# Altium PCB PCB_Solenoid_Board-v1.0.PcbDoc
Units mm, origin at the board's own origin, x right, y up, seen from the top; angles counter-clockwise.
Board outline 65.99 x 57.84 mm, 2 copper layers (Top Layer, Bottom Layer), stack 1.57 mm thick; 61 components, 37 nets, 164 pads, 111 vias.
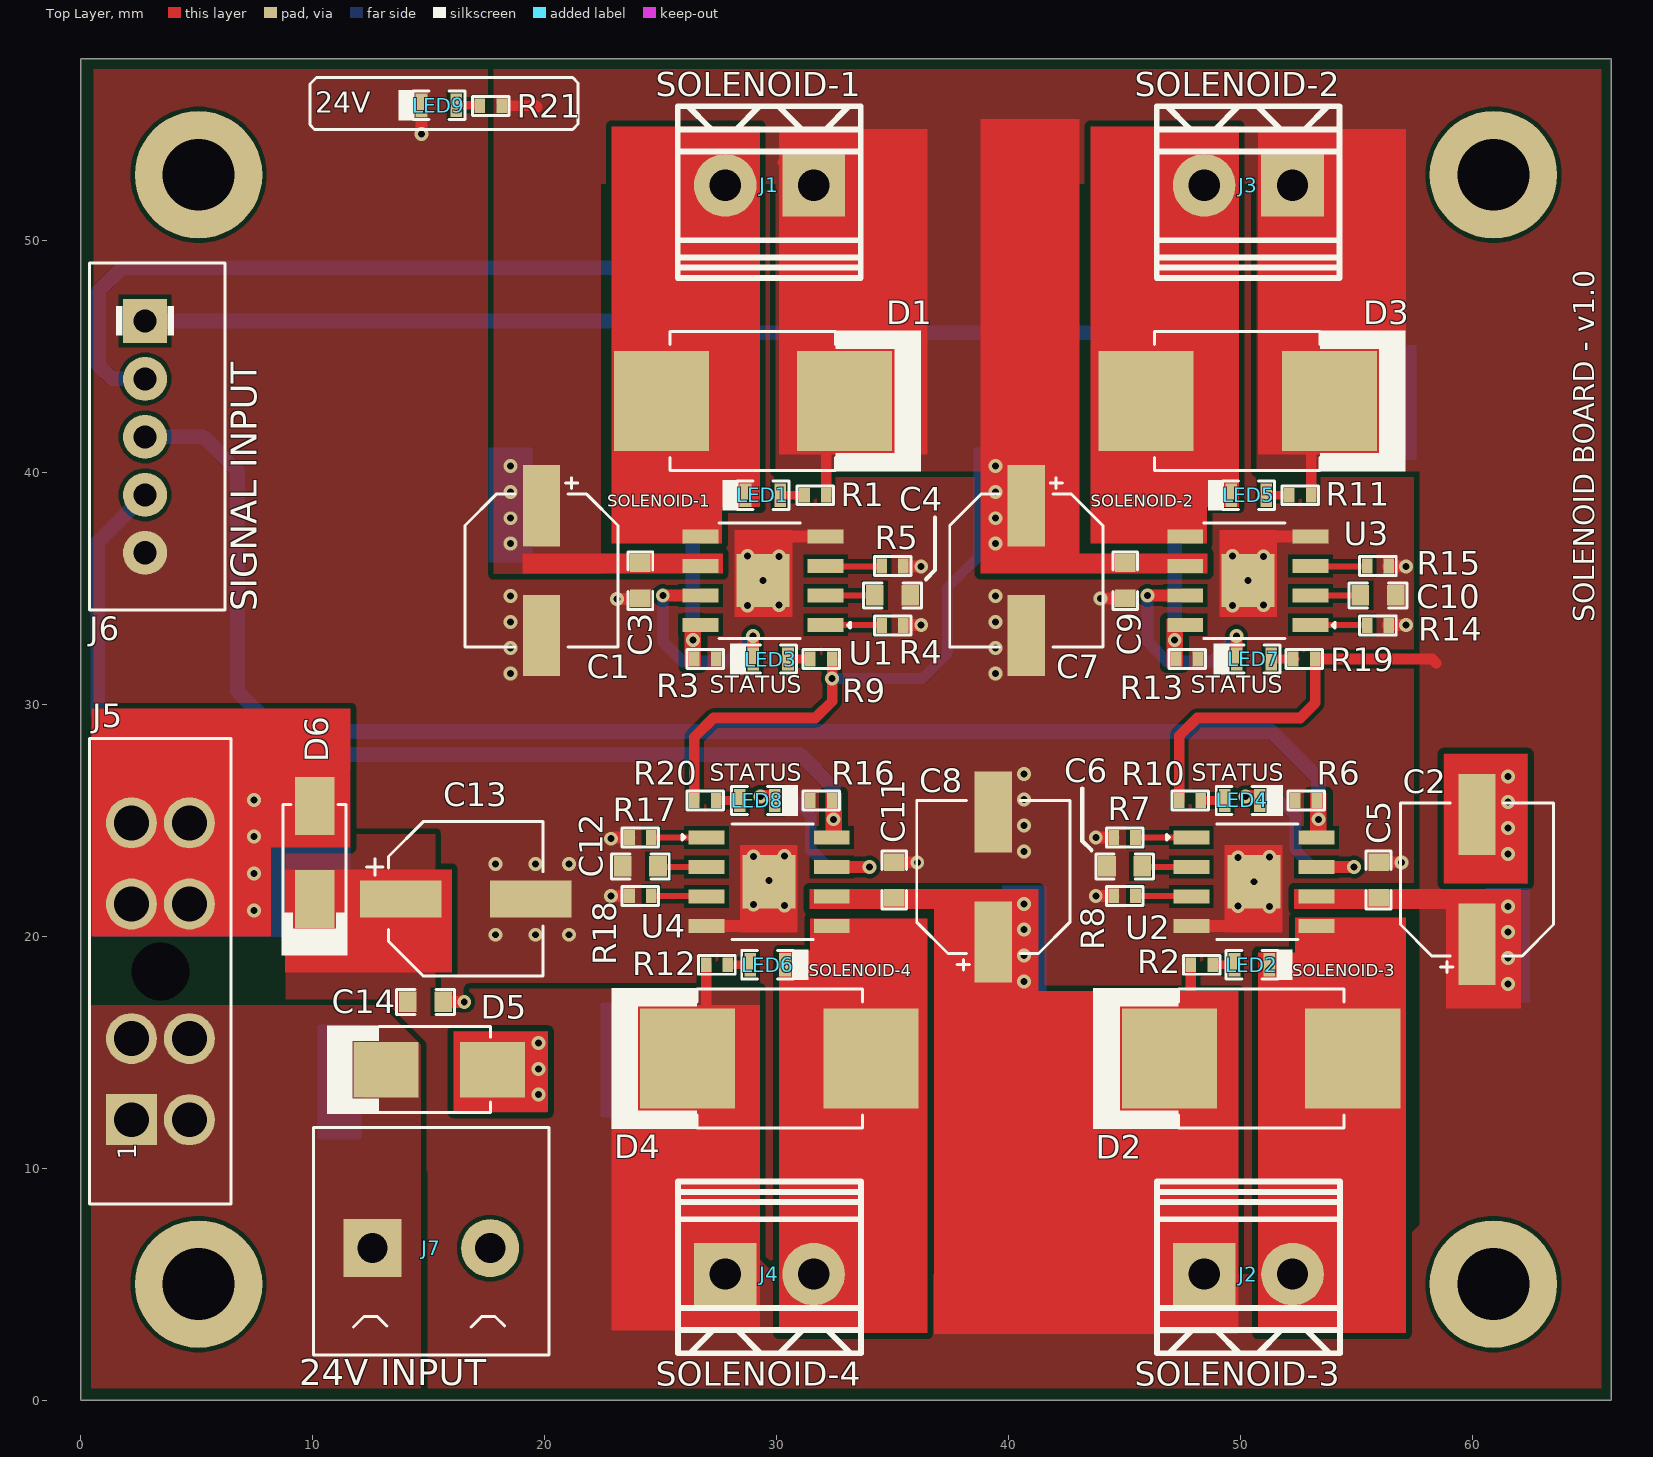
[diagram p0: Top Layer view]
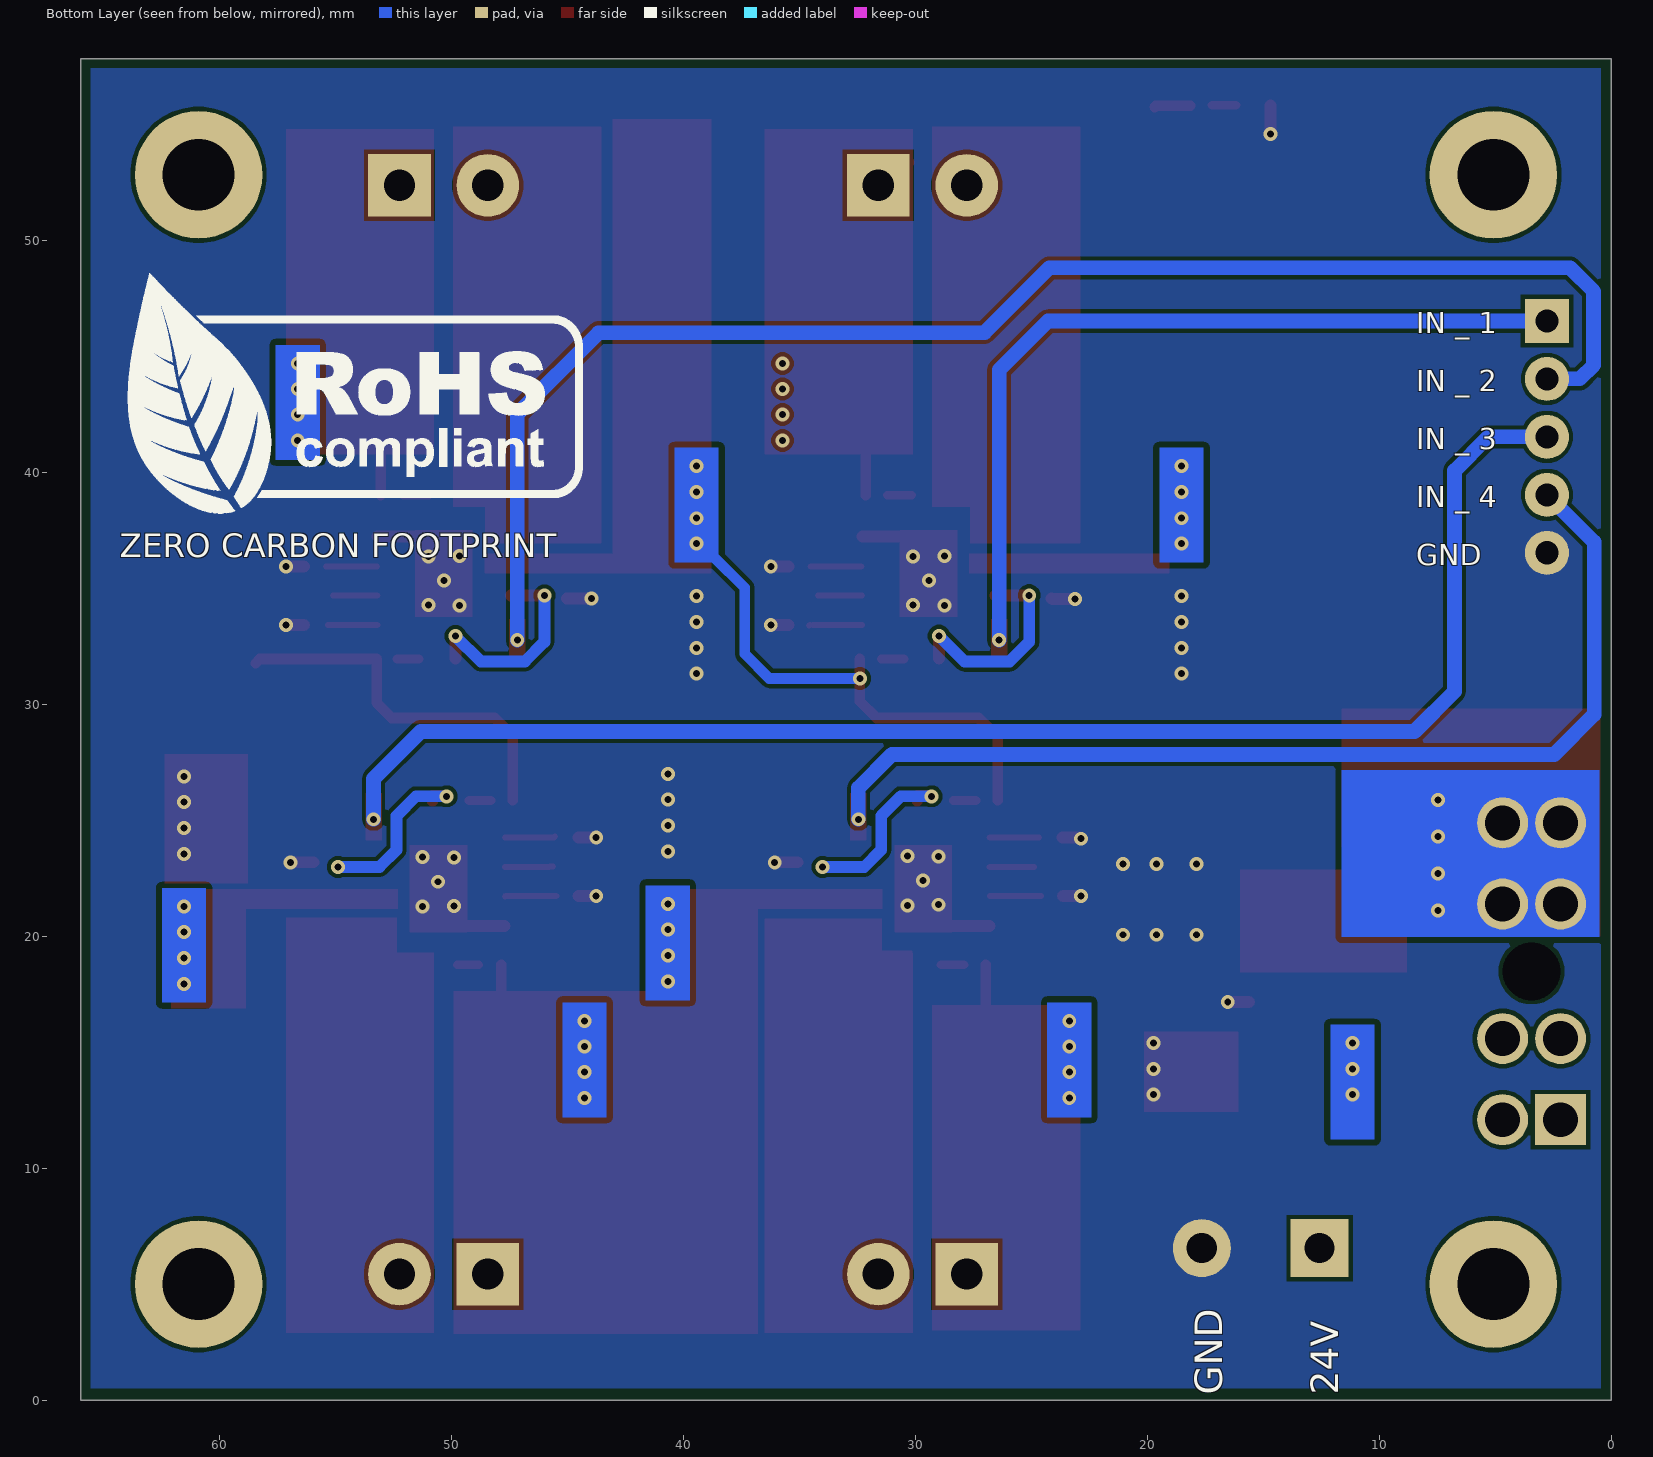
[diagram p1: Bottom Layer view, seen from below]
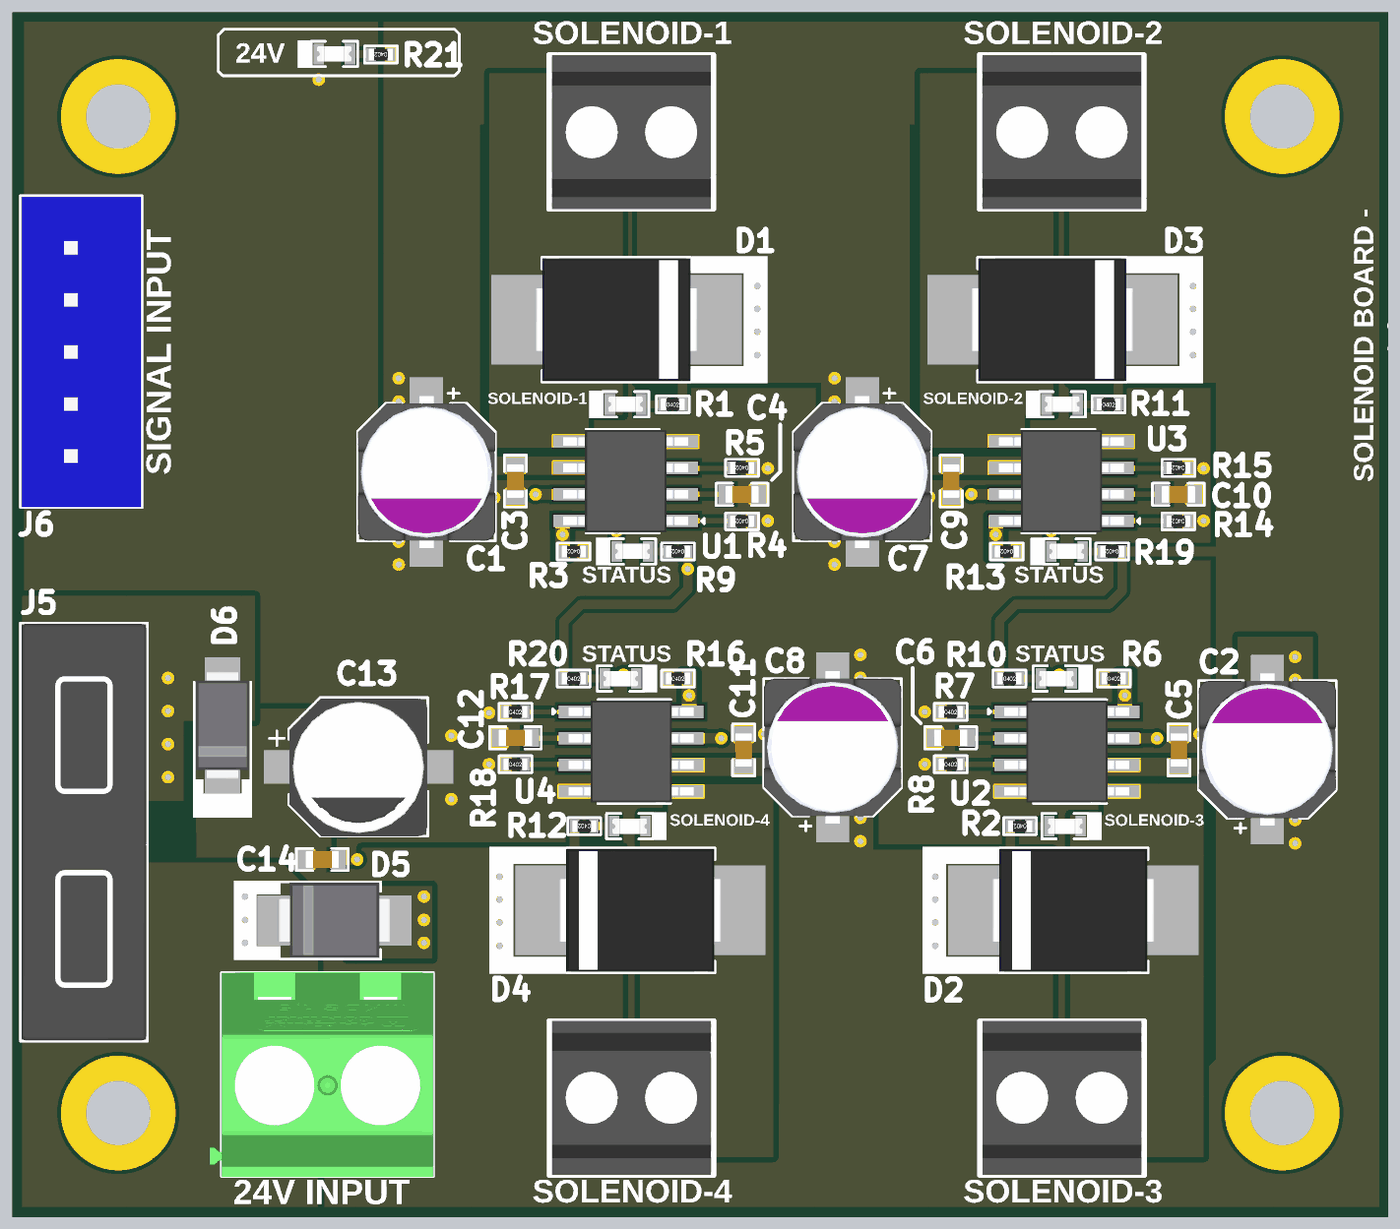
[diagram p2: 3D render of the assembled board from above, using the file's embedded part models]

## Layer stack, top to bottom
Top Solder: solder mask 0.01, Solder Resist, Dk 3.5
Top Layer: signal copper 0.035
Dielectric 1: core 1.5, FR-4, Dk 4.8
Bottom Layer: signal copper 0.035
Bottom Solder: solder mask 0.01, Solder Resist, Dk 3.5

## Board outline
0,0 0,57.836 65.989,57.836 65.989,0

## Design rules (kind name [scope] priority, off if disabled: settings)
Clearance [All] p1: gap=0.178 ignorepadtopadclearanceinfootprint=FALSE except(0.254: Fill-Poly Poly-Poly)
ComponentClearance [All] p1: gap=0.127 collisioncheckmode=3 verticalgap=0.127 showdistances=FALSE
HoleSize [All] p1: absolutevalues=TRUE maxlimit=25.4 minlimit=0.025 maxpercent=80.000 minpercent=20.000
HoleToHoleClearance [All] p1: gap=0.025 allowstackedmicrovias=TRUE
MinimumSolderMaskSliver [All] p1: minsoldermaskwidth=0
PolygonConnect [All] p1: connectstyle=Direct reliefconductorwidth=0.254 reliefentries=4 polygonreliefangle="90 Angle" airgapwidth=0.254
RoutingVias [All] p1: holewidth=0.3 width=0.6 viastyle="Through Hole" minholewidth=0.3 minwidth=0.6 maxholewidth=0.3 maxwidth=0.6
SilkToSilkClearance [All] p1: silktosilkclearance=0
SilkToSolderMaskClearance [IsPad] p1: minsilkscreentomaskgap=0 clearancetoexposedcopper=TRUE
SolderMaskExpansion SolderMaskExpansion_1 [IsVia] p1: expansion=0 istentingtop=FALSE soldermaskfromhole=TRUE
SolderMaskExpansion [Not IsVia] p2: expansion=0.102 istentingtop=FALSE
UnRoutedNet [All] p1: checkbadconnections=TRUE
Width [All] p1: maxlimit=2.54 minlimit=0.203 preferedwidth=0.305 minimp=50.000000 maximp=50.000000 favimp=50.000000
23 further rules are at their usual default settings.

## Components (designator, comment, footprint, x,y, rotation, side; value= is the part's Value field where it differs from the comment)
C1 "10uF" 50SVPF10M 19.863,35.763 r270 top locked
C2 "10uF" 50SVPF10M 60.198,22.454 r90 top locked
C3 "100nF" Cap-0603 24.13,35.331 r90 top locked
C4 "100nF" Cap-0603 35.001,34.696 r180 top locked
C5 "100nF" Cap-0603 55.956,22.428 r270 top locked
C6 "100nF" Cap-0603 45.009,23.012 r0 top locked
C7 "10uF" 50SVPF10M 40.767,35.763 r270 top locked
C8 "10uF" 50SVPF10M 39.345,22.555 r90 top locked
C9 "100nF" Cap-0603 45.034,35.331 r90 top locked
C10 "100nF" Cap-0603 55.931,34.696 r180 top locked
C11 "100nF" Cap-0603 35.077,22.428 r270 top locked
C12 "100nF" Cap-0603 24.13,23.012 r0 top locked
C13 "100uF" RVT1H101M0607 16.601,21.615 r0 top locked
C14 "100nF" Cap-0603 14.863,17.17 r180 top locked
D1 "MURS360T3G" SMC 28.981,43.078 r180 top locked
D2 "MURS360T3G" SMC 50.893,14.732 r0 top locked
D3 "MURS360T3G" SMC 49.884,43.078 r180 top locked
D4 "MURS360T3G" SMC 30.119,14.732 r0 top locked
D5 "SMBJ28A-13-F" SMB_ 15.452,14.249 r180 top locked value=330pF
D6 "SS56" SMA 10.084,23.615 r90 top locked
J1 "DB125-3.81-2P-BK-S" DB125-3.81-2P-BK-S 29.693,52.375 r180 top locked
J2 "DB125-3.81-2P-BK-S" DB125-3.81-2P-BK-S 50.343,5.436 r0 top locked
J3 "DB125-3.81-2P-BK-S" DB125-3.81-2P-BK-S 50.343,52.375 r180 top locked
J4 "DB125-3.81-2P-BK-S" DB125-3.81-2P-BK-S 29.693,5.436 r0 top locked
J5 "178.6165.0002" 178.6165.0002 3.434,18.49 r90 top locked
J6 "B5B-XH-A(LF)(SN)" B5B-XH-A(LF)(SN)_ 2.774,41.533 r270 top locked
J7 "1715721" 1715721 15.113,6.553 r0 top locked
LED1 "Emerald" LED-0603 29.413,39.014 r180 top locked
LED2 "Emerald" LED-0603 50.495,18.771 r0 top locked
LED3 "RED" LED-0603 29.743,31.953 r180 top locked
LED4 "RED" LED-0603 50.077,25.857 r0 top locked
LED5 "Emerald" LED-0603 50.355,39.014 r180 top locked
LED6 "Emerald" LED-0603 29.616,18.771 r0 top locked
LED7 "RED" LED-0603 50.584,31.953 r180 top locked
LED8 "RED" LED-0603 29.172,25.857 r0 top locked
LED9 "RED" LED-0603 15.443,55.829 r180 top locked
R1 "2.2K" Res-0402 31.674,39.014 r0 top locked
R2 "2.2K" Res-0402 48.336,18.771 r180 top locked
R3 "10K" Res-0402 26.924,31.953 r180 top locked
R4 "1M" Res-0402 35.001,33.401 r180 top locked value=1MR
R5 "1M" Res-0402 35.001,35.966 r180 top locked value=1MR
R6 "10K" Res-0402 52.832,25.857 r0 top locked
R7 "1M" Res-0402 45.009,24.257 r0 top locked value=1MR
R8 "1M" Res-0402 45.009,21.742 r0 top locked value=1MR
R9 "3.9K" Res-0402 31.928,31.953 r180 top locked value=3.9kR
R10 "3.9K" Res-0402 47.828,25.857 r0 top locked value=3.9kR
R11 "2.2K" Res-0402 52.578,39.014 r0 top locked
R12 "2.2K" Res-0402 27.432,18.771 r180 top locked
R13 "10K" Res-0402 47.701,31.953 r180 top locked
R14 "1M" Res-0402 55.931,33.401 r180 top locked value=1MR
R15 "1M" Res-0402 55.931,35.966 r180 top locked value=1MR
R16 "10K" Res-0402 31.928,25.857 r0 top locked
R17 "1M" Res-0402 24.13,24.257 r0 top locked value=1MR
R18 "1M" Res-0402 24.13,21.742 r0 top locked value=1MR
R19 "3.9K" Res-0402 52.756,31.953 r180 top locked value=3.9kR
R20 "3.9K" Res-0402 26.924,25.857 r0 top locked value=3.9kR
R21 "3.9K" Res-0402 17.678,55.804 r180 top locked value=3.9kR
U1 "DRV103H/2K5" "8-SO PowerPad" 29.419,35.331 r180 top locked
U2 "DRV103H/2K5" "8-SO PowerPad" 50.582,22.352 r0 top locked
U3 "DRV103H/2K5" "8-SO PowerPad" 50.321,35.331 r180 top locked
U4 "DRV103H/2K5" "8-SO PowerPad" 29.681,22.352 r0 top locked

## Footprints (in the part's own frame and the unit in brackets; to place one, negate y for a bottom-side part, rotate by r counter-clockwise, add the part's x,y. Pads: shape width x height; smd on the part's side, far side on the other; paste and mask are expansions set on the pad)
"8-SO PowerPad" [mm]
  rect 1.55x0.6 smd mask+0.07: 1(-2.7,1.905) 2(-2.7,0.635) 3(-2.7,-0.635) 4(-2.7,-1.905) 5(2.7,-1.905) 6(2.7,-0.635) 7(2.7,0.635) 8(2.7,1.905)
  rect 2.287x2.287 smd mask+0.07: 9(0,0)
  silkscreen extent -3.76,-2.49 1.9,2.49, body extent -3,-2.45 3,2.45, height 1.7
50SVPF10M [mm]
  rect 3.5x1.6 smd: 1(-2.8,0) 2(2.8,0)
  silkscreen extent -4.01,-3.3 3.3,3.3, body extent -3.65,-3.3 3.65,3.3, height 5.9
178.6165.0002 [mm]
  rect 2.2x2.2 hole 1.5 paste-2539.97 mask+0.051: 1(-6.4,1.25)
  round 2.2 hole 1.5 paste-2539.97 mask+0.051: 2(-2.9,1.25) 3(2.9,1.25) 4(6.4,1.25) 5(6.4,-1.25) 6(2.9,-1.25) 7(-2.9,-1.25) 8(-6.4,-1.25)
  round 0 hole 2.5 unplated paste-2539.97: ""(0,0)
  silkscreen extent -10.03,-3.05 10.03,3.05, body extent -10,-3 10,3, height 17.5
1715721 [mm]
  rect 2.5x2.5 / inner round 2.5 / far side rect 2.5x2.5 hole 1.3: 1(-2.54,0)
  round 2.5 hole 1.3: 2(2.54,0)
  silkscreen extent -5.08,-4.6 5.08,5.2, body extent -5.64,-4.62 5.09,5.21, height 14.2
B5B-XH-A(LF)(SN)_ [mm] "XH Header Male Pin 0.098\"(2.50mm) 5 Through Hole,P=2.5mm Wire To Board / Wire To Wire Connector RoHS"
  rect 1.9x1.9 hole 1: 1(-5,0)
  round 1.9 hole 1: 2(-2.5,0) 3(0,0) 4(2.5,0) 5(5,0)
  silkscreen extent -7.49,-2.39 7.47,3.45, body extent -7.45,-2.34 7.45,3.41, height 7
Cap-0603 [mil]
  rect 30x35 smd mask+2.36: 1(-30,0) 2(30,0)
  silkscreen extent -49,-21 49,21, body extent -32,-16 31,16, height 34
DB125-3.81-2P-BK-S [mm]
  rect 2.7x2.7 hole 1.35 paste-2539.97 mask+0.051: 1(-1.905,0)
  round 2.7 hole 1.35 paste-2539.97 mask+0.051: 2(1.905,0)
  silkscreen extent -3.94,-3.41 3.95,3.99, body extent -3.81,-3.4 3.81,4, height 8.2
LED-0603 [mm]
  rect 0.5x1 smd: 1(-0.75,0) 2(0.75,0)
  silkscreen extent -1.12,-0.66 1.75,0.66, body extent -0.82,-0.37 0.82,0.36, height 0.68
Res-0402 [mil]
  rect 18x25 smd mask+2.17: 1(-18.5,0) 2(18.5,0)
  silkscreen extent -32,-17 32,16, body extent -23,-11 23,11, height 16
RVT1H101M0607 [mm]
  rect 3.5x1.6 smd: 1(-2.8,0) 2(2.8,0)
  silkscreen extent -4.27,-3.33 3.32,3.33, body extent -3.31,-3.33 3.29,3.27, height 7.94
SMA [mm]
  rect 2.5x1.7 smd: 1(-2,0) 2(2,0)
  silkscreen extent -4.44,-1.42 2.06,1.42, body extent -2.6,-1.3 2.6,1.3, height 2.4
SMB_ [mm]
  rect 2.8x2.4 smd: 1(-2.3,0) 2(2.3,0)
  silkscreen extent -2.21,-1.9 4.83,1.91, body extent -2.7,-1.8 2.7,1.8, height 2.3
SMC [mm]
  rect 4.1x4.3 smd: 1(-3.95,0) 2(3.95,0)
  silkscreen extent -7.24,-3.05 3.58,3.05, body extent -3.9,-2.95 3.9,2.95, height 2.41

## Part data
C1 C2 C7 C8: library part 50SVPF10M, "CAP ALUM POLY 10UF 20% 50V SMD", LCSC Part Number=C2162323, Manufacturer=Panasonic, Supplier Part Number=667-50SVPF10M, Category="Polymer Capacitors", ComponentLink1Description=https://datasheet.ciiva.com/48542/svpf-eng-ds-48542427.pdf?src-supplier=Distrelec, ComponentLink1URL=https://datasheet.ciiva.com/48542/svpf-eng-ds-48542427.pdf?src-supplier=Distrelec, ComponentLink2Description=https://datasheet.ciiva.com/24216/svpf-os-262415-24216043.pdf?src-supplier=Mouser, ComponentLink2URL=https://datasheet.ciiva.com/24216/svpf-os-262415-24216043.pdf?src-supplier=Mouser, ComponentLink3Description=https://datasheet.ciiva.com/25761/1734360-25761263.pdf?src-supplier=Farnell, ComponentLink3URL=https://datasheet.ciiva.com/25761/1734360-25761263.pdf?src-supplier=Farnell, Item Type=Capacitor, Manufacturer Part Number=50SVPF10M, Material=4242ConductorMaterial, Pricing="1=1.12, 10=0.801, 50=0.801, 100=0.665, 1000=0.555, 10000=0.504 (USD)", RoHS=Yes, Stock=29802, Supplier=Mouser
C3 C4 C5 C6 C9 C10 C11 C12 C14: library part CC0603KRX5R9BB104, "CAP CER 0.1UF 50V X5R 0603", Case Code (Imperial)=0603, Case Code (Metric)=1608, Dielectric=X5R, LCSC Part Number=C110022, Manufacturer=Yageo, Max Operating Temperature=85°C, Min Operating Temperature=-55°C, Package Quantity=4000, Supplier Part Number 1=311-4046-1-ND, Tolerance=10%, Voltage Rating=50V, Capacitance=100nF, Case/Package=0603, Category="Ceramic Capacitors", ComponentLink1Description=http://www.mouser.com/ds/2/447/Yageo_UPY-GP_NP0_16V-to-50V_9-358835.pdf?src-supplier=Mouser, ComponentLink1URL=http://www.mouser.com/ds/2/447/Yageo_UPY-GP_NP0_16V-to-50V_9-358835.pdf?src-supplier=Mouser, ComponentLink2Description=https://www.yageo.com/upload/media/product/productsearch/datasheet/mlcc/UPY-GPHC_X5R_4V-to-50V_26.pdf?src-supplier=Digi-Key, ComponentLink2URL=https://www.yageo.com/upload/media/product/productsearch/datasheet/mlcc/UPY-GPHC_X5R_4V-to-50V_26.pdf?src-supplier=Digi-Key, ComponentLink3Description=http://www.yageo.com/exep/pages/download/literatures/ProductSelectionGuide%202014_Final_2.pdf?src-supplier=Digi-Key, ComponentLink3URL=http://www.yageo.com/exep/pages/download/literatures/ProductSelectionGuide%202014_Final_2.pdf?src-supplier=Digi-Key, Halogen Free="Halogen Free", Item Type=Capacitor, Lead Free="Lead Free", Length=0.063inch, Manufacturer Part Number=CC0603KRX5R9BB104, Mount="Surface Mount", Packaging="Tape and Reel", Pricing 1="1=0.10000, 10=0.05200, 50=0.02820, 100=0.02310, 500=0.01648, 1000=0.01294 (USD)", RoHS=Yes, Stock 1=152253, Supplier 1=Digi-Key, Termination=SMD/SMT, Thickness=0.035inch, Voltage Rating (DC)=50V, Weight=7.1E-05oz, Width=0.031inch
C13: library part RVT1H101M0607, "100uF 50V ±20% SMD,D6.3xL7.7mm Aluminum Electrolytic Capacitors - SMD ROHS", LCSC Part Number=C3151829, Manufacturer=ROQANG, Package=SMD,D6.3xL7.7mm, ComponentLink1Description=LCSC, ComponentLink1URL=https://www.lcsc.com/product-detail/Aluminum-Electrolytic-Capacitors-SMD_ROQANG-RVT1H101M0607_C3151829.html, Item Type=Capacitor, Manufacturer Part Number=RVT1H101M0607
D1 D2 D3 D4: "SMC(DO-214AB) Diodes - Fast Recovery Rectifiers ROHS", LCSC Part Number=C7436549, Manufacturer=FUXINSEMI, Package=SMC(DO-214AB), ComponentLink1Description=LCSC, ComponentLink1URL=https://www.lcsc.com/product-detail/Diodes-Fast-Recovery-Rectifiers_FUXINSEMI-MURS360T3G_C7436549.html, Item Type=Diodes, Manufacturer Part Number=MURS360T3G
D5: "TVS DIODE 28VWM 45.4VC SMB", Breakdown Voltage=35.8V, Case/Package=SMB, Clamping Voltage=45.4V, Forward Voltage=5V, Leakage Current=5uA, Manufacturer=Diodes, Max Operating Temperature=150°C, Max Output current=13.2A, Max Power Dissipation=600W, Min Breakdown Voltage=31.1V, Min Operating Temperature=-55°C, Package Quantity=3000, Power Line Protection=No, Reverse Standoff Voltage=28V, Supplier Part Number=8797342, Test Current=1mA, Category="TVS Diodes", Clamping Voltage-Max=45.4V, ComponentLink1Description=https://datasheet.ciiva.com/16387/ds19002-16387564.pdf?src-supplier=Future+Electronics, ComponentLink1URL=https://datasheet.ciiva.com/16387/ds19002-16387564.pdf?src-supplier=Future+Electronics, ComponentLink2Description=https://datasheet.ciiva.com/26912/getdatasheetpartid-234000-26912533.pdf?src-supplier=Verical, ComponentLink2URL=https://datasheet.ciiva.com/26912/getdatasheetpartid-234000-26912533.pdf?src-supplier=Verical, Diode Type=ZENER, Direction=Unidirectional, Height=2.62mm, Item Type=Diode, Lead Free="Lead Free", Length=4.57mm, Manufacturer Part Number=SMBJ28A-13-F, Max Breakdown Voltage=35.8V, Max Reverse Leakage Current=5uA, Max Surge Current=13.2A, Mounting Technology="Surface Mount", Number of Elements=1, Number of Unidirectional Channels=1, Packaging="Tape and Reel", Peak Pulse Current=13.2A, Peak Pulse Power=600W, Pins=2, Polarity=Unidirectional, Power Dissipation=600W, Pricing="3000=0.0734, 9000=0.0706, 15000=0.0693, 30000=0.0676, 60000=0.065 (USD)", Radiation Hardening=No, Reverse Breakdown Voltage=31.1V, RoHS=Yes, RoHS Compliant=Yes, Series=SMBJ, Stock=39000, Supplier="Future Electronics", Termination=SMD/SMT, Voltage Rating (DC)=28V, Width=3.9mm, Working Voltage=28V
D6: "DIODE SCHOTTKY 60V 5A SMA", LCSC Par Number=C65009, Manufacturer=MDD, ComponentLink1Description=LCSC, ComponentLink1URL=https://www.lcsc.com/product-detail/Schottky-Barrier-Diodes-SBD_MDD-Microdiode-Electronics-SS56_C65009.html, Iterm Type=Diode, Manufacturer Part Number=SS56
J1 J2 J3 J4: "1x2P 10A -40℃~+105℃ 300V Black 16~26 Straight 3.81mm 0.5~1 1 2 Plugin,P=3.81mm Screw terminal ROHS", LCSC Part Number=C430618, Manufacturer=DORABO, Package=Plugin,P=3.81mm, ComponentLink1Description=LCSC, ComponentLink1URL=https://www.lcsc.com/product-detail/Screw-terminal_DORABO-DB125-3-81-2P-BK-S_C430618.html, Item Type="Terminal Block", Manufacturer Part Number=DB125-3.81-2P-BK-S
J5: "FUSE HOLDER BLADE 80V PCB", Current Rating=30A, LCSC Part Number=C207061, Manufacturer="Littelfuse Wickmann", Supplier Part Number=9883406, Body Material=4896ConductorMaterial, Category="Fuse Holders", ComponentLink1Description=https://datasheet.ciiva.com/295/littelfuse-ato-pcb-fuse-holders-178-6765-295568.pdf?src-supplier=Digikey, ComponentLink1URL=https://datasheet.ciiva.com/295/littelfuse-ato-pcb-fuse-holders-178-6765-295568.pdf?src-supplier=Digikey, ComponentLink2Description=https://datasheet.ciiva.com/4480/flrholder-58019-4480354.pdf?src-supplier=Mouser, ComponentLink2URL=https://datasheet.ciiva.com/4480/flrholder-58019-4480354.pdf?src-supplier=Mouser, ComponentLink3Description=https://datasheet.ciiva.com/16372/flrholder-16372408.pdf?src-supplier=Future+Electronics, ComponentLink3URL=https://datasheet.ciiva.com/16372/flrholder-16372408.pdf?src-supplier=Future+Electronics, ComponentLink4Description=https://datasheet.ciiva.com/15187/getdatasheetpartid-31610-15187861.pdf?src-supplier=Verical, ComponentLink4URL=https://datasheet.ciiva.com/15187/getdatasheetpartid-31610-15187861.pdf?src-supplier=Verical, Item Type="Fuse Holder", Lead Free=5697LeadFree, Manufacturer Part Number=178.6165.0002, Material=4896ConductorMaterial, Pricing="1=2.02, 40=1.96, 125=1.91, 400=1.86, 1250=1.77 (USD)", RoHS=Yes, Stock=3811, Supplier="Future Electronics", Thickness=6mm, Width=17.5mm
J6: "Conn Shrouded Header HDR 5 POS 2.5mm Solder ST Thru-Hole Box", Color=Natural, Contact Resistance=20mR, Current Rating=3A, Flammability Rating="UL94 V-0", Housing Color=White, Insulation Resistance=1GR, LCSC Part Number=C157991, Manufacturer=JST, Max Operating Temperature=85°C, Max Voltage Rating (AC)=250V, Min Operating Temperature=-25°C, Supplier Part Number 1=455-2270-ND, Category="Headers and Wire Housings", ComponentLink1Description=https://datasheet.ciiva.com/26894/getdatasheetpartid-455618-26894798.pdf?src-supplier=Verical, ComponentLink1URL=https://datasheet.ciiva.com/26894/getdatasheetpartid-455618-26894798.pdf?src-supplier=Verical, ComponentLink2Description=https://datasheet.ciiva.com/11746/0900766b8082f55f-11746654.pdf?src-supplier=RSComponents, ComponentLink2URL=https://datasheet.ciiva.com/11746/0900766b8082f55f-11746654.pdf?src-supplier=RSComponents, ComponentLink3Description=https://datasheet.ciiva.com/26894/getdatasheetpartid-640991-26894479.pdf?src-supplier=Verical, ComponentLink3URL=https://datasheet.ciiva.com/26894/getdatasheetpartid-640991-26894479.pdf?src-supplier=Verical, ComponentLink4Description=https://datasheet.ciiva.com/8052/1684882-8052063.pdf?src-supplier=Element14, ComponentLink4URL=https://datasheet.ciiva.com/8052/1684882-8052063.pdf?src-supplier=Element14, ComponentLink5Description=https://datasheet.ciiva.com/20207/523653-20207174.pdf?src-supplier=Rapid+Electronics, ComponentLink5URL=https://datasheet.ciiva.com/20207/523653-20207174.pdf?src-supplier=Rapid+Electronics, ComponentLink6Description=https://datasheet.ciiva.com/724/exh-724390.pdf?src-supplier=Digi-Key, ComponentLink6URL=https://datasheet.ciiva.com/724/exh-724390.pdf?src-supplier=Digi-Key, Connector Type=Header, Contact Finish - Mating=TIN, Contact Material=Brass, Contact Plating=Tin,Lead,Copper, Contact Post Length=0.134inch, Contact Shape=Square, Contact Type="Male Pin", Depth=5.75mm, Fastening Type=Detent, Gender=Male, Housing Material=Polyamide, Insulation Color=Natural, Insulation Height=0.276inch, Insulation Material=Nylon, Item Type="JST Connector", Lead Free="Lead Free", Lead Pitch=2.5mm, Length=14.9mm, Manufacturer Part Number=B5B-XH-A(LF)(SN), Mated Stacking Heights=9.8mm, Max Current Rating=3A, Mount="Through Hole", Number of Contacts=5, Number of Positions=5, Number of Rows=1, Orientation=Straight, Packaging=Bulk, Pitch=2.5mm, Pricing 1="1=0.25000, 10=0.23700, 100=0.16440, 500=0.13914, 1000=0.11383, 5000=0.10119, 10000=0.09170 (USD)", REACH SVHC="No SVHC", RoHS=Yes, Series=XH, Stock 1=1949, Supplier 1=Digi-Key, Termination=Press-Fit, Voltage Rating=250V, Voltage Rating (AC)=250V, Wire/Cable Gauge=22AWG
J7: "TERM BLK 2P SIDE ENT 5.08MM PCB", Manufacturer="Phoenix Contact", Supplier Part Number=277-1263-ND, ComponentLink1Description=https://datasheet.ciiva.com/1120/1697161-1120393.pdf?src-supplier=Farnell, ComponentLink1URL=https://datasheet.ciiva.com/1120/1697161-1120393.pdf?src-supplier=Farnell, ComponentLink2Description=https://datasheet.ciiva.com/832/1715721-832095.pdf?src-supplier=Digikey, ComponentLink2URL=https://datasheet.ciiva.com/832/1715721-832095.pdf?src-supplier=Digikey, ComponentLink3Description=https://datasheet.ciiva.com/15169/getdatasheetpartid-212174-15169929.pdf?src-supplier=Verical, ComponentLink3URL=https://datasheet.ciiva.com/15169/getdatasheetpartid-212174-15169929.pdf?src-supplier=Verical, ComponentLink4Description=https://datasheet.ciiva.com/16046/1715721-16046034.pdf?src-supplier=Onlinecomponents.com, ComponentLink4URL=https://datasheet.ciiva.com/16046/1715721-16046034.pdf?src-supplier=Onlinecomponents.com, Item Type="Terminal Blocks", Manufacturer Part Number=1715721, Pricing="1=0.94 (USD)", RoHS=Yes, Stock=13160, Supplier=Digikey
LED1 LED2 LED5 LED6: library part NCD0603G2, "Emerald 0603 Light Emitting Diodes (LED) ROHS", LCSC Part Number=C87326, Manufacturer="Foshan NationStar Optoelectronics", Package=0603, ComponentLink1Description=LCSC, ComponentLink1URL=https://www.lcsc.com/product-detail/Light-Emitting-Diodes-LED_Foshan-NationStar-Optoelectronics-NCD0603G2_C87326.html, Item Type=LED, Manufacturer Part Number=NCD0603G2
LED3 LED4 LED7 LED8 LED9: library part NCD0603R3, "RED LED 0603 Light Emitting Diodes", LCSC Part Number=C3151730, Manufacturer="Foshan NationStar Optoelectronics", Package=0603, ComponentLink1Description=LCSC, ComponentLink1URL=https://www.lcsc.com/product-detail/Light-Emitting-Diodes-LED_Foshan-NationStar-Optoelectronics-NCD0603R3_C3151730.html, Item Type=LED, Manufacturer Part Number=NCD0603R3
R1 R2 R11 R12: library part RC0402FR-072K2L, "RES SMD 2.2K OHM 1% 1/16W 0402", Case Code (Imperial)=0402, Case Code (Metric)=1005, LCSC Part Number=C114762, Manufacturer=Yageo, Max Operating Temperature=155°C, Max Power Dissipation=63mW, Min Operating Temperature=-55°C, Resistance=2.2kR, Resistance Tolerance=1%, Resistor Type="Thick Film", Supplier Part Number 1=311-2.20KLRCT-ND, Temperature Coefficient=100ppm/°C, Voltage Rating=50V, Case/Package=0402, ComponentLink1Description=http://www.farnell.com/datasheets/2167052.pdf?src-supplier=Element14, ComponentLink1URL=http://www.farnell.com/datasheets/2167052.pdf?src-supplier=Element14, ComponentLink2Description=http://www.yageo.com/documents/recent/PYu-RC_Group_51_RoHS_L_9.pdf?src-supplier=Mouser, ComponentLink2URL=http://www.yageo.com/documents/recent/PYu-RC_Group_51_RoHS_L_9.pdf?src-supplier=Mouser, ComponentLink3Description=http://documents.rs-components.com/techlib://itc_doclist_GB.htm?stockno=6186532&src-supplier=RSComponents, ComponentLink3URL=http://documents.rs-components.com/techlib://itc_doclist_GB.htm?stockno=6186532&src-supplier=RSComponents, ComponentLink4Description=http://www.yageo.com/documents/recent/PYu-RC0402_51_RoHS_L_6_r.pdf?src-supplier=Future+Electronics, ComponentLink4URL=http://www.yageo.com/documents/recent/PYu-RC0402_51_RoHS_L_6_r.pdf?src-supplier=Future+Electronics, Construction=Rectangular, Depth=0.5mm, Features="Moisture Resistant", Height=0.35mm, Lead Free="Lead Free", Length=1mm, Manufacturer Part Number=RC0402FR-072K2L, Military Standard=Not, Number of Terminations=2, Packaging="Tape and Reel", Power Rating=63mW, Pricing 1="1=0.1, 10=0.016, 100=0.0066, 1000=0.00299, 2500=0.00259, 5000=0.00214 (USD)", REACH SVHC=Unknown, RoHS Compliant=Yes, Series=RC, Size Code=0402, Stock 1=966157, Supplier 1=Digi-Key, Technology="THICK FILM", Termination=SMD/SMT, Tolerance=1%, Weight=2.3E-05oz, Width=0.5mm
R3 R6 R13 R16: library part RC0402FR-0710KL, "RES 10K OHM 1% 1/16W 0402", Case Code (Imperial)=0402, Case Code (Metric)=1005, LCSC Part Number=C60490, Manufacturer=Yageo, Max Operating Temperature=155°C, Max Power Dissipation=63mW, Min Operating Temperature=-55°C, Power Rating=62.5mW, Resistance=10kR, Resistance Tolerance=1%, Resistor Type="Thick Film", Supplier Part Number 1=603-RC0402FR-0710KL, Temperature Coefficient=100ppm/°C, Voltage Rating=50V, Case/Package=0402, Category="Chip SMD Resistors", ComponentLink1Description=https://datasheet.ciiva.com/7660/38568-7660787.pdf?src-supplier=Element14, ComponentLink1URL=https://datasheet.ciiva.com/7660/38568-7660787.pdf?src-supplier=Element14, ComponentLink2Description=https://datasheet.ciiva.com/7849/1686128-7849814.pdf?src-supplier=Element14, ComponentLink2URL=https://datasheet.ciiva.com/7849/1686128-7849814.pdf?src-supplier=Element14, ComponentLink3Description=https://datasheet.ciiva.com/7983/1018594-7983486.pdf?src-supplier=Element14, ComponentLink3URL=https://datasheet.ciiva.com/7983/1018594-7983486.pdf?src-supplier=Element14, ComponentLink4Description=https://datasheet.ciiva.com/22747/1018594-22747512.pdf?src-supplier=Element14, ComponentLink4URL=https://datasheet.ciiva.com/22747/1018594-22747512.pdf?src-supplier=Element14, ComponentLink5Description=https://datasheet.ciiva.com/12667/pyu-rc0402-51-rohs-l-6-r-12667067.pdf?src-supplier=Mouser, ComponentLink5URL=https://datasheet.ciiva.com/12667/pyu-rc0402-51-rohs-l-6-r-12667067.pdf?src-supplier=Mouser, ComponentLink6Description=https://datasheet.ciiva.com/7849/1784430-7849813.pdf?src-supplier=Element14, ComponentLink6URL=https://datasheet.ciiva.com/7849/1784430-7849813.pdf?src-supplier=Element14, ComponentLink7Description=https://datasheet.ciiva.com/7849/1784430-7849815.pdf?src-supplier=Element14, ComponentLink7URL=https://datasheet.ciiva.com/7849/1784430-7849815.pdf?src-supplier=Element14, Construction=Rectangular, Depth=0.5mm, Features="Moisture Resistant", Height=0.32mm, Item Type=Resistor, Lead Free="Lead Free", Lead Pitch=0.2mm, Length=1mm, Manufacturer Part Number=RC0402FR-0710KL, Military Standard=Not, Number of Pins=2, Number of Terminations=2, Packaging="Tape and Reel", Pricing 1="1=0.10000, 10=0.01400, 50=0.01400, 100=0.00500, 1000=0.00300, 10000=0.00200 (USD)", REACH SVHC="No SVHC", RoHS=Yes, RoHS Compliant=Yes, Series=RC, Stock 1=18648329, Supplier 1=Mouser, Termination=SMD/SMT, Tolerance=1%, Voltage Rating (DC)=50V, Width=0.5mm, Working Voltage=50V
R4 R5 R7 R8 R14 R15 R17 R18: library part RC0402FR-071ML, "RES 1M OHM 1% 1/16W 0402", Case Code (Imperial)=0402, Case Code (Metric)=1005, LCSC Part Number=C138033, Manufacturer=Yageo, Max Operating Temperature=155°C, Max Power Dissipation=63mW, Min Operating Temperature=-55°C, Resistance Tolerance=1%, Resistor Type="Thick Film", Supplier Part Number=311-1.00MLRCT-ND, Temperature Coefficient=100ppm/°C, Voltage Rating=50V, Case/Package=0402, Category="Chip SMD Resistors", ComponentLink1Description=https://datasheet.ciiva.com/11808/0900766b80c66297-11808125.pdf?src-supplier=Rs, ComponentLink1URL=https://datasheet.ciiva.com/11808/0900766b80c66297-11808125.pdf?src-supplier=Rs, ComponentLink2Description=https://datasheet.ciiva.com/46394/1018594-46394951.pdf?src-supplier=Element14, ComponentLink2URL=https://datasheet.ciiva.com/46394/1018594-46394951.pdf?src-supplier=Element14, ComponentLink3Description=https://datasheet.ciiva.com/7849/1018594-7849883.pdf?src-supplier=Element14, ComponentLink3URL=https://datasheet.ciiva.com/7849/1018594-7849883.pdf?src-supplier=Element14, ComponentLink4Description=https://datasheet.ciiva.com/7849/1018594-7849882.pdf?src-supplier=Element14, ComponentLink4URL=https://datasheet.ciiva.com/7849/1018594-7849882.pdf?src-supplier=Element14, ComponentLink5Description=https://datasheet.ciiva.com/16741/pyu-rc0402-51-rohs-l-6-r-16741081.pdf?src-supplier=Future+Electronics, ComponentLink5URL=https://datasheet.ciiva.com/16741/pyu-rc0402-51-rohs-l-6-r-16741081.pdf?src-supplier=Future+Electronics, Construction=Rectangular, Depth=0.5mm, Features="Moisture Resistant", Height=0.32mm, Item Type=Resistor, Lead Free=5697LeadFree, Length=1mm, Manufacturer Part Number=RC0402FR-071ML, Military Standard=Not, Number of Terminations=2, Packaging="Tape and Reel", Power Rating=63mW, Pricing="1=0.1, 10=0.015, 50=0.0088, 100=0.0073, 500=0.00488, 1000=0.00417, 5000=0.00297 (USD)", Reach SVHC Compliant=Unknown, RoHS=Yes, RoHS Compliant=Yes, Series=RC, Stock=6516, Supplier=Digikey, Technology="THICK FILM", Termination=SMD/SMT, Tolerance=1%, Voltage Rating (AC)=50V
R9 R10 R19 R20 R21: library part RC0402FR-073K9L, "RES 3.9K OHM 1% 1/16W 0402", Case Code (Imperial)=0402, Case Code (Metric)=1005, LCSC Part Number=C131467, Manufacturer=Yageo, Max Operating Temperature=155°C, Max Power Dissipation=63mW, Min Operating Temperature=-55°C, Power Rating=62.5mW, Resistance Tolerance=1%, Resistor Type="Thick Film", Supplier Part Number=9808155, Temperature Coefficient=100ppm/°C, Voltage Rating=50V, Case/Package=0402, Category="Chip SMD Resistors", ComponentLink1Description=https://datasheet.ciiva.com/12666/pyu-rc0402-51-rohs-l-6-r-12666997.pdf?src-supplier=Mouser, ComponentLink1URL=https://datasheet.ciiva.com/12666/pyu-rc0402-51-rohs-l-6-r-12666997.pdf?src-supplier=Mouser, ComponentLink2Description=https://datasheet.ciiva.com/7849/1018594-7849989.pdf?src-supplier=Element14, ComponentLink2URL=https://datasheet.ciiva.com/7849/1018594-7849989.pdf?src-supplier=Element14, ComponentLink3Description=https://datasheet.ciiva.com/7849/1018594-7849990.pdf?src-supplier=Element14, ComponentLink3URL=https://datasheet.ciiva.com/7849/1018594-7849990.pdf?src-supplier=Element14, ComponentLink4Description=https://datasheet.ciiva.com/15189/getdatasheetpartid-469246-15189453.pdf?src-supplier=Verical, ComponentLink4URL=https://datasheet.ciiva.com/15189/getdatasheetpartid-469246-15189453.pdf?src-supplier=Verical, Construction=Rectangular, Depth=0.5mm, Features="Moisture Resistant", Item Type=Resistor, Lead Free="Lead Free", Length=1mm, Manufacturer Part Number=RC0402FR-073K9L, Military Standard=Not, Number of Terminations=2, Packaging="Tape and Reel", Pricing="10000=0.0011, 100000=0.0011, 300000=0.001, 750000=0.001, 2000000=0.0009 (USD)", Reach SVHC Compliant=Unknown, RoHS=Yes, RoHS Compliant=Yes, Series=RC, Stock=6910000, Supplier="Future Electronics", Termination=SMD/SMT, Tolerance=1%, Voltage Rating (AC)=50V
U1 U2 U3 U4: "IC PWR DRVR N-CHAN 1:1 8SOPWRPAD", LCSC Part Number=C544418, Manufacturer="Texas Instruments", ComponentLink1Description=https://datasheet.ciiva.com/15110/getdatasheetpartid-547625-15110691.pdf?src-supplier=Verical, ComponentLink1URL=https://datasheet.ciiva.com/15110/getdatasheetpartid-547625-15110691.pdf?src-supplier=Verical, ComponentLink2Description=https://datasheet.ciiva.com/1958/drv103-1958756.pdf?src-supplier=Digikey, ComponentLink2URL=https://datasheet.ciiva.com/1958/drv103-1958756.pdf?src-supplier=Digikey, ComponentLink3Description=https://datasheet.ciiva.com/1958/drv103-1958757.pdf?src-supplier=Digikey, ComponentLink3URL=https://datasheet.ciiva.com/1958/drv103-1958757.pdf?src-supplier=Digikey, ComponentLink4Description=https://datasheet.ciiva.com/1958/drv103-1958758.pdf?src-supplier=Digikey, ComponentLink4URL=https://datasheet.ciiva.com/1958/drv103-1958758.pdf?src-supplier=Digikey, Height=1.7mm, Item Type=IC, Lead Free=5697LeadFree, Length=4.89mm, Manufacturer Part Number=DRV103H/2K5, Number of Channels=1NUMBER, Pricing="1=4.53, 10=3.85, 50=3.85, 100=3.33, 1000=2.39, 10000=2.24 (USD)", RoHS=Yes, RoHS Compliant=5897YesNo, Stock=2092, Supplier=Mouser, Thickness=1.48mm, Width=3.9mm

## Free pads (board coordinates)
  round 5.5 hole 3.1 unplated: " "(5.08,52.832) " "(60.909,52.832) ""(5.08,5.004) ""(60.909,5.004)

## Via types
v1: diameter 0.6, hole 0.3, Top Layer to Bottom Layer, 111 vias

## Nets (pads, with @x,y where several pads share a name; then routed paths per layer and width w, separated by ;. In a path a pad name is that pad's centre, name@x,y a point inside that pad or via, vN(x,y) a via of type N, cw(c..) or ccw(c..) an arc to the next point about the centre after c; other vN are vias at no path point)
+24V: C1.1 C2.1 C3.2 C5.2 C7.1 C8.1 C9.2 C11.2 C13.1 C14.2 D1.1 D2.1 D3.1 D4.1 D6.1 J1.1 J2.1 J3.1 J4.1 R1.2 R2.2 R9.1 R10.1 R11.2 R12.2 R19.1 R20.1 R21.1 U1.6 U2.6 U3.6 U4.6 | length 57.9
  Top Layer w0.457: R21.1 19.634,55.804 19.685,55.753 ; D4.1 26.962,15.526 R12.2 ; R20.1 26.454,28.588 27.28,29.413 31.674,29.413 32.398,30.137 R9.1 ; J1.1@30.277,53.365 31.598,52.045 31.598,49.936 ; D1.1@32.08,41.834 32.144,41.77 R1.2 ; D2.1 47.866,15.655 R2.2 ; R10.1 47.358,28.639 48.133,29.413 52.578,29.413 53.226,30.061 R19.1 58.268,31.953 58.445,31.775 ; D3.1@52.883,41.91 53.048,41.745 R11.2
  Bottom Layer w0.457: v1(32.398,31.115) 36.297,31.115 37.363,32.182 37.363,35.027 38.692,36.355 38.71,36.355 38.76,36.406 38.76,36.424
  other v1: 23.368,13.03 44.27,13.03 23.368,14.153 44.27,14.153 23.368,15.25 44.27,15.25 23.368,16.347 44.27,16.347 61.53,17.947 40.677,18.048 61.53,19.069 40.677,19.171 61.53,20.192 40.677,20.294 61.53,21.289 40.677,21.391 18.531,36.927 39.435,36.927 18.531,38.025 39.435,38.025 18.531,39.147 39.435,39.147 18.531,40.27 39.435,40.27 35.732,41.377 56.634,41.377 35.732,42.499 56.634,42.499 35.732,43.597 56.634,43.597 35.732,44.694 56.634,44.694
GND: C1.2 C2.2 C3.1 C4.1 C5.1 C6.1 C7.2 C8.2 C9.1 C10.1 C11.1 C12.1 C13.2 C14.1 D5.1 J6.5 J7.2 LED9.2 R3.1 R4.1 R5.1 R6.1 R7.1 R8.1 R13.1 R14.1 R15.1 R16.1 R17.1 R18.1 U1.4 U1.9 U2.4 U2.9 U3.4 U3.9 U4.4 U4.9 | length 20.3
  Top Layer w0.508: v1(14.693,54.598) LED9.2 ; C14.1 v1(16.535,17.17) ; v1(22.863,21.742) R18.1@23.637,21.742 ; v1(22.863,24.206) 22.888,24.206 22.938,24.257 R17.1 ; v1(23.114,34.544) 24.105,34.544 C3.1 ; U4.4@26.806,20.447 28.747,20.447 ; 30.302,37.186 30.353,37.236 U1.4@32.294,37.236 ; C11.1 v1(36.068,23.19) ; R4.1@35.463,33.426 v1(36.237,33.426) ; R5.1@35.463,35.941 v1(36.237,35.941) ; v1(43.764,21.742) R8.1 ; v1(43.764,24.257) R7.1 ; v1(43.967,34.569) C9.1 ; U2.4@47.707,20.447 49.648,20.447 ; 51.254,37.236 U3.4@53.196,37.236 ; C5.1 v1(56.947,23.19) ; R14.1@56.364,33.426 v1(57.139,33.426) ; R15.1@56.364,35.941 v1(57.139,35.941)
  other v1: 19.745,13.172 19.745,14.27 19.745,15.392 17.882,20.065 19.609,20.065 21.057,20.065 51.249,21.285 49.902,21.311 30.347,21.336 29.001,21.361 50.582,22.352 29.681,22.403 17.882,23.114 19.609,23.114 21.057,23.114 49.902,23.393 51.249,23.419 29.001,23.444 30.347,23.47 61.53,23.547 40.677,23.648 61.53,24.669 40.677,24.771 61.53,25.792 40.677,25.894 61.53,26.889 40.677,26.991 18.531,31.327 39.435,31.327 18.531,32.425 39.435,32.425 18.531,33.547 39.435,33.547 28.753,34.265 49.654,34.265 30.099,34.29 51,34.29 18.531,34.67 39.435,34.67 29.419,35.331 50.321,35.331 30.099,36.373 51,36.373 28.753,36.398 49.654,36.398
IN-1: J6.1 R3.2 U1.8 | length 36.1
  Bottom Layer w0.635: J6.1 24.282,46.533 26.391,44.425 v1(26.391,32.766)
IN-2: J6.2 R13.2 U3.8 | length 64.6
  Bottom Layer w0.635: J6.2 2.772,44.035 1.355,44.035 0.762,44.628 0.762,47.803 1.778,48.819 3.886,48.819 24.232,48.819 27.026,46.025 43.663,46.025 47.168,42.52 v1(47.168,32.766)
IN-3: J6.3 R6.2 U2.8 | length 64
  Bottom Layer w0.635: J6.3 5.305,41.533 6.756,40.081 6.756,30.556 8.484,28.829 51.333,28.829 53.365,26.797 v1(53.365,25.044)
IN-4: J6.4 R16.2 U4.8 | length 45.3
  Top Layer w0.254: U4.8@32.398,24.38 32.521,24.257 U4.8@32.556,24.257
  Bottom Layer w0.635: J6.4 0.737,36.995 0.737,29.566 2.464,27.838 31.013,27.838 32.461,26.391 v1(32.461,25.044) ; J6.4@3.081,38.725 J6.4@3.389,39.033
NetC4_2: C4.2 U1.2 | length 1.9
  Top Layer w0.254: U1.2@32.294,34.696 C4.2@34.205,34.696
NetC6_2: C6.2 U2.2 | length 2.1
  Top Layer w0.254: C6.2@45.618,23.012 C6.2 45.796,22.987 U2.2@47.707,22.987
NetC10_2: C10.2 U3.2 | length 1.9
  Top Layer w0.254: U3.2@53.196,34.696 C10.2@55.107,34.696
NetC12_2: C12.2 U4.2 | length 1.9
  Top Layer w0.254: C12.2@24.895,22.987 U4.2@26.806,22.987
NetD1_2: D1.2 J1.2 LED1.2 U1.5 | length 7
  Top Layer w0.635: D1.2 25.031,39.84 25.832,39.04 LED1.2@28.425,39.04
NetD2_2: D2.2 J2.2 LED2.2 U2.5 | length 7
  Top Layer w0.635: 51.577,18.771 54.17,18.771 54.97,17.97 D2.2@54.97,14.732
NetD3_2: D3.2 J3.2 LED5.2 U3.5 | length 7
  Top Layer w0.635: D3.2 45.934,39.84 46.734,39.04 49.327,39.04
NetD4_2: D4.2 J4.2 LED6.2 U4.5 | length 1.7
  Top Layer w0.635: 32.537,18.542 32.556,18.56 U4.5@32.556,20.244
NetD5_2: D5.2 J5.1 J5.2 J5.7 J5.8 J7.1
  other v1: 11.159,13.172 11.159,14.27 11.159,15.392
NetD6_2: D6.2 J5.3 J5.4 J5.5 J5.6
  other v1: 7.468,21.12 7.468,22.708 7.468,24.295 7.468,25.883
NetLED1_1: LED1.1 R1.1 | length 1
  Top Layer w0.381: LED1.1 R1.1
NetLED2_1: LED2.1 R2.1 | length 0.9
  Top Layer w0.381: R2.1@48.829,18.771 LED2.1 LED2.1@49.759,18.771
NetLED3_1: LED3.1 R9.2 | length 1
  Top Layer w0.381: LED3.1 R9.2
NetLED3_2: LED3.2 U1.7 | length 9.1
  Top Layer w0.508: v1(25.095,34.696) U1.7@26.544,34.696 ; LED3.2@28.981,31.967 v1(28.981,32.944)
  Bottom Layer w0.508: v1(25.095,34.696) 25.095,32.69 25.933,31.852 27.889,31.852 v1(28.981,32.944)
NetLED4_1: LED4.1 R10.2 | length 1
  Top Layer w0.381: R10.2 LED4.1@49.263,25.857
NetLED4_2: LED4.2 U2.7 | length 9
  Top Layer w0.508: v1(50.213,26.035) v1@50.231,26.017 ; v1@50.231,26.043 LED4.2@50.823,26.043 ; LED4.2@50.823,26.017 50.827,26.013 LED4.2 ; U2.7@53.457,22.987 v1(54.906,22.987)
  Bottom Layer w0.508: v1(50.213,26.035) 51.534,26.035 52.372,25.197 52.372,23.724 53.109,22.987 v1(54.906,22.987)
NetLED5_1: LED5.1 R11.1 | length 1.1
  Top Layer w0.381: LED5.1@50.991,39.014 R11.1
NetLED6_1: LED6.1 R12.1 | length 1
  Top Layer w0.381: R12.1 LED6.1@28.892,18.771
NetLED7_1: LED7.1 R19.2 | length 1
  Top Layer w0.381: LED7.1@51.398,31.953 R19.2@52.362,31.953
NetLED7_2: LED7.2 U3.7 | length 9.1
  Top Layer w0.508: v1(45.997,34.696) U3.7@47.446,34.696 ; LED7.2@49.832,31.967 v1(49.832,32.944)
  Bottom Layer w0.508: v1(45.997,34.696) 45.997,32.69 46.835,31.852 48.74,31.852 v1(49.832,32.944)
NetLED8_1: LED8.1 R20.2 | length 1
  Top Layer w0.381: R20.2 LED8.1@28.358,25.857
NetLED8_2: LED8.2 U4.7 | length 9
  Top Layer w0.508: v1(29.312,26.035) v1@29.329,26.017 ; v1@29.329,26.043 LED8.2@29.918,26.043 ; LED8.2@29.918,26.017 29.922,26.013 LED8.2 ; U4.7@32.556,22.987 v1(34.005,22.987)
  Bottom Layer w0.508: v1(29.312,26.035) 30.632,26.035 31.471,25.197 31.471,23.724 32.207,22.987 v1(34.005,22.987)
NetLED9_1: LED9.1 R21.2 | length 1
  Top Layer w0.381: LED9.1@16.168,55.829 LED9.1 R21.2@17.208,55.829
NetR4_2: R4.2 U1.1 | length 2.2
  Top Layer w0.254: U1.1@32.294,33.426 R4.2@34.421,33.426 ; R4.2@34.557,33.426 R4.2@34.582,33.401
NetR5_2: R5.2 U1.3 | length 2.2
  Top Layer w0.254: U1.3@32.32,35.941 R5.2@34.523,35.941
NetR7_2: R7.2 U2.1 | length 2.2
  Top Layer w0.254: R7.2@45.529,24.308 45.58,24.257 U2.1@47.707,24.257
NetR8_2: R8.2 U2.3 | length 2.2
  Top Layer w0.254: R8.2 47.682,21.742 U2.3@47.707,21.717
NetR14_2: R14.2 U3.1 | length 2.1
  Top Layer w0.254: U3.1@53.196,33.426 R14.2@55.323,33.426
NetR15_2: R15.2 U3.3 | length 2.2
  Top Layer w0.254: U3.3@53.221,35.941 R15.2@55.424,35.941
NetR17_2: R17.2 U4.1 | length 2.1
  Top Layer w0.254: R17.2@24.679,24.257 U4.1@26.806,24.257
NetR18_2: R18.2 U4.3 | length 2.2
  Top Layer w0.254: R18.2@24.577,21.742 U4.3@26.78,21.742
pads on no net: J5.

## Polygon pours and split planes (outlines as drawn)
GND on Top Layer "NONET_L-01_P-001" (solid, remove dead copper, pour order 5): 0.559,57.379 65.557,57.379 65.557,0.559 0.559,0.559
NetD5_2 on Top Layer "NONET_L-01_P-001" (solid, pour order 0): 0.457,17.018 12.954,17.018 14.656,15.316 14.656,0.508 0.457,0.508
+24V on Top Layer "NONET_L-01_P-001" (solid, remove dead copper, pour order 3): 15.291,24.409 15.291,17.729 29.286,17.729 29.286,6.071 29.921,5.436 55.601,5.436 57.734,7.569 57.734,40.056 50.698,40.056 50.698,52.451 43.053,52.451 43.053,40.056 29.972,40.056 29.972,52.451 22.428,52.451 22.428,35.636 17.805,35.636 17.805,57.379 65.557,57.379 65.557,0.508 14.961,0.508 14.961,9.855 8.839,15.977 8.839,24.409
GND on Bottom Layer "NONET_L-01_P-001" (solid, remove dead copper, pour order 6): 0.457,57.429 65.557,57.429 65.557,0.508 0.457,0.508

## Other copper
Top Layer:
  rectangle net +24V: 8.814,18.44 16.002,22.885
  region net NetD1_2: 22.885,54.915 22.885,38.506 29.286,38.506 29.286,54.915
  region net NetD3_2: 43.536,54.915 43.536,38.506 49.936,38.506 49.936,54.915
  region net NetD2_2: 57.15,2.896 57.15,19.304 50.749,19.304 50.749,2.896
  region net +24V: 50.749,54.813 50.749,40.767 57.15,40.767 57.15,54.813
  region net +24V: 30.099,54.813 30.099,40.767 36.5,40.767 36.5,54.813
  rectangle net GND: 58.776,22.276 62.382,27.864
  rectangle net NetD6_2: 0.457,23.825 11.633,29.82
  rectangle net NetD6_2: 0.457,19.99 8.204,29.82
  rectangle net GND: 16.078,12.421 20.142,15.9
  region net NetD4_2: 36.5,2.896 36.5,19.304 30.099,19.304 30.099,2.896
  region net +24V: 41.3,22.047 36.779,22.047 36.779,2.845 41.3,2.845
  region net +24V: 49.911,17.639 40.651,17.639 40.651,2.845 49.911,2.845
  rectangle net +24V: 38.786,35.636 43.053,55.245
  region net +24V: 62.103,22.047 58.871,22.047 58.871,16.891 62.103,16.891
  region net +24V: 40.05,22.047 31.414,22.047 31.414,21.184 40.05,21.184
  region net +24V: 60.951,22.047 52.315,22.047 52.315,21.184 60.951,21.184
  rectangle net +24V: 39.951,35.636 48.587,36.5
  region net GND: 30.906,23.927 28.417,23.927 28.417,20.168 30.906,20.168
  region net GND: 51.807,23.927 49.318,23.927 49.318,20.168 51.807,20.168
  rectangle net GND: 49.095,33.757 51.585,37.516
  rectangle net GND: 28.194,33.757 30.683,37.516
  region net NetD3_2: 48.556,38.837 43.536,38.837 43.536,36.932 48.556,36.932
  region net NetD1_2: 27.655,38.837 22.885,38.837 22.885,36.932 27.655,36.932
  rectangle net NetD2_2: 52.347,18.847 57.15,20.803
  rectangle net NetD4_2: 31.445,18.847 36.5,20.777
  region net +24V: 29.286,2.997 29.286,17.043 22.885,17.043 22.885,2.997
  rectangle net IN-4: 32.106,24.13 32.817,26.187
  rectangle net IN-3: 53.01,24.13 53.721,26.187
  region net IN-2: 47.523,33.68 46.812,33.68 46.812,31.623 47.523,31.623
  rectangle net NetD4_2: 30.124,18.237 33.35,19.38
  rectangle net +24V: 19.05,35.636 27.686,36.5
  region net IN-1: 26.746,33.68 26.035,33.68 26.035,31.623 26.746,31.623
Bottom Layer:
  region net NetD5_2: 12.113,11.24 12.113,16.193 10.208,16.193 10.208,11.24
  rectangle net NetD6_2: 0.508,19.964 11.633,27.178
  region net +24V: 57.588,40.541 57.588,45.494 55.683,45.494 55.683,40.541
  region net +24V: 19.484,36.118 19.484,41.071 17.579,41.071 17.579,36.118
  region net +24V: 40.389,36.118 40.389,41.071 38.484,41.071 38.484,36.118
  region net +24V: 24.322,12.195 24.322,17.148 22.417,17.148 22.417,12.195
  region net +24V: 45.223,12.195 45.223,17.148 43.318,17.148 43.318,12.195
  region net +24V: 41.631,17.239 41.631,22.192 39.726,22.192 39.726,17.239
  region net +24V: 62.484,17.137 62.484,22.09 60.579,22.09 60.579,17.137

## Silkscreen, mask and mechanical layers (free items; w line width, h text height)
Top Overlay:
  lines w0.127: 9.881,54.991 9.881,56.744 10.16,57.023 21.209,57.023 21.438,56.794 21.438,55.016 21.209,54.788 10.084,54.788 9.881,54.991
  lines w0.178: 36.436,35.395 36.83,35.789 36.83,38.049 ; 43.18,26.365 43.18,24.105 43.574,23.711
  text "SOLENOID-1" at 24.785,55.873 h1.78
  text "SOLENOID-2" at 45.453,55.873 h1.78
  text "24V" at 10.109,55.202 h1.52
  text "SOLENOID-1" at 22.707,38.354 h0.89
  text "SOLENOID-2" at 43.553,38.354 h0.89
  text "SIGNAL INPUT" at 7.955,34.011 h1.91 r90
  text "SOLENOID BOARD - v1.0" at 65.568,33.538 h1.52 r90
  text "STATUS" at 27.112,30.236 h1.27
  text "STATUS" at 47.851,30.236 h1.27
  text "STATUS" at 27.112,26.452 h1.27
  text "STATUS" at 47.902,26.452 h1.27
  text "SOLENOID-4" at 31.386,18.11 h0.89
  text "SOLENOID-3" at 52.245,18.11 h0.89
  text "24V INPUT" at 9.417,0.273 h1.91
  text "SOLENOID-4" at 24.783,0.273 h1.78
  text "SOLENOID-3" at 45.453,0.273 h1.78
Bottom Overlay:
  drawing of 16 lines, arcs and shapes, not listed
  text "IN _ 1" at 8.412,45.695 h1.52
  text "IN _ 2" at 8.412,43.195 h1.52
  text "IN _ 3" at 8.412,40.695 h1.52
  text "IN _ 4" at 8.412,38.195 h1.52
  text "ZERO CARBON FOOTPRINT" at 64.313,36.347 h1.02
  text "GND" at 8.412,35.695 h1.52
  text "24V" at 11.381,0.229 h2.03 r270
  text "GND" at 16.385,0.229 h2.03 r270
Board Outline:
  the board outline again, w0.381
Fabrication:
  drawing of 191 lines, arcs and shapes, not listed
  text "Layer" at 72.24,21.082 h1.52
  text "Name" at 82.652,21.082 h1.52
  text "Material" at 106.267,21.082 h1.52
  text "Thickness" at 128.105,21.082 h1.52
  text "Constant" at 144.611,21.082 h1.52
  text "Board Layer Stack" at 159.085,21.082 h1.52
  text "Top Overlay" at 82.652,18.034 h1.52
  text "Top Solder" at 82.652,14.986 h1.52
  text "Solder Resist" at 106.267,14.986 h1.52
  text "0.39mil" at 128.105,14.986 h1.52
  text "3.5" at 144.611,14.986 h1.52
  text "1" at 72.24,11.938 h1.52
  text "Top Layer" at 82.652,11.938 h1.52
  text "1.38mil" at 128.105,11.938 h1.52
  text "Dielectric 1" at 82.652,8.89 h1.52
  text "FR-4" at 106.267,8.89 h1.52
  text "59.06mil" at 128.105,8.89 h1.52
  text "4.8" at 144.611,8.89 h1.52
  text "2" at 72.24,5.842 h1.52
  text "Bottom Layer" at 82.652,5.842 h1.52
  text "1.38mil" at 128.105,5.842 h1.52
  text "Bottom Solder" at 82.652,2.794 h1.52
  text "Solder Resist" at 106.267,2.794 h1.52
  text "0.39mil" at 128.105,2.794 h1.52
  text "3.5" at 144.611,2.794 h1.52
  text "Bottom Overlay" at 82.652,-0.254 h1.52
  text "Total board thickness:" at 72.24,-3.302 h1.52
  text "62.60mil" at 128.105,-3.302 h1.52
Drill Drawing:
  circle w0.254: c72.99,42.973 r0.847
  lines w0.254: 72.143,34.929 72.567,34.929 72.567,34.506 73.413,34.506 73.413,34.929 73.837,34.929 73.837,35.776 73.413,35.776 73.413,36.199 72.567,36.199 72.567,35.776 72.143,35.776 72.143,34.929 ; 72.143,40.009 73.837,40.009 72.99,38.316 72.143,40.009 ; 72.143,45.936 73.837,45.936 73.837,47.629 72.143,47.629 72.143,45.936 ; 72.143,49.746 72.99,50.169 73.837,49.746 73.413,50.593 73.837,51.439 72.99,51.016 72.143,51.439 72.567,50.593 72.143,49.746 ; 72.143,53.979 72.567,53.979 72.99,53.556 73.413,53.979 73.837,53.979 73.413,54.403 73.837,54.826 73.413,54.826 72.99,55.249 72.567,54.826 72.143,54.826 72.567,54.403 72.143,53.979 ; 72.143,57.366 72.143,57.789 72.567,58.213 72.143,58.636 72.143,59.059 72.567,59.059 72.99,58.636 73.413,59.059 73.837,59.059 73.837,58.636 73.413,58.213 73.837,57.789 73.837,57.366 73.413,57.366 72.99,57.789 72.567,57.366 72.143,57.366
  lines w0.381: 70.625,33.363 306.17,33.363 ; 70.625,60.033 306.17,60.033 ; 84.617,29.553 84.617,63.843 ; 99.599,29.553 99.599,63.843 ; 128.547,29.553 128.547,63.843 ; 141.396,29.553 141.396,63.843 ; 160.034,29.553 160.034,63.843 ; 198.123,29.553 198.123,63.843 ; 213.105,29.553 213.105,63.843 ; 232.048,29.553 232.048,63.843 ; 248.554,29.553 248.554,63.843 ; 270.544,29.553 270.544,63.843 ; 70.625,29.553 306.17,29.553 306.17,63.843 70.625,63.843 70.625,29.553
  text "Symbol" at 72.911,61.176 h1.83
  text "Count" at 85.76,61.176 h1.83
  text "Hole Size" at 100.742,61.176 h1.83
  text "Plated" at 129.69,61.176 h1.83
  text "Hole Type" at 142.539,61.176 h1.83
  text "Drill Layer Pair" at 161.177,61.176 h1.83
  text "Via/Pad" at 199.266,61.176 h1.83
  text "Pad Shape" at 214.248,61.176 h1.83
  text "Template" at 233.191,61.176 h1.83
  text "Hole Length" at 249.697,61.176 h1.83
  text "Routed Path Length" at 271.687,61.176 h1.83
  text "111" at 85.76,57.366 h1.52
  text "11.81mil (0.300mm)" at 100.742,57.366 h1.52
  text "PTH" at 129.69,57.366 h1.52
  text "Round" at 142.539,57.366 h1.52
  text "Top Layer - Bottom Layer" at 161.177,57.366 h1.52
  text "Via" at 199.266,57.366 h1.52
  text "Rounded" at 214.248,57.366 h1.52
  text "v60h30" at 233.191,57.366 h1.52
  text "-" at 249.697,57.366 h1.52
  text "-" at 271.687,57.366 h1.52
  text "5" at 85.76,53.556 h1.52
  text "39.37mil (1.000mm)" at 100.742,53.556 h1.52
  text "PTH" at 129.69,53.556 h1.52
  text "Round" at 142.539,53.556 h1.52
  text "Top Layer - Bottom Layer" at 161.177,53.556 h1.52
  text "Pad" at 199.266,53.556 h1.52
  text "(Mixed)" at 214.248,53.556 h1.52
  text "(Mixed)" at 233.191,53.556 h1.52
  text "-" at 249.697,53.556 h1.52
  text "-" at 271.687,53.556 h1.52
  text "2" at 85.76,49.746 h1.52
  text "51.18mil (1.300mm)" at 100.742,49.746 h1.52
  text "PTH" at 129.69,49.746 h1.52
  text "Round" at 142.539,49.746 h1.52
  text "Top Layer - Bottom Layer" at 161.177,49.746 h1.52
  text "Pad" at 199.266,49.746 h1.52
  text "Rounded" at 214.248,49.746 h1.52
  text "(Mixed)" at 233.191,49.746 h1.52
  text "-" at 249.697,49.746 h1.52
  text "-" at 271.687,49.746 h1.52
  text "8" at 85.76,45.936 h1.52
  text "53.15mil (1.350mm)" at 100.742,45.936 h1.52
  text "PTH" at 129.69,45.936 h1.52
  text "Round" at 142.539,45.936 h1.52
  text "Top Layer - Bottom Layer" at 161.177,45.936 h1.52
  text "Pad" at 199.266,45.936 h1.52
  text "(Mixed)" at 214.248,45.936 h1.52
  text "(Mixed)" at 233.191,45.936 h1.52
  text "-" at 249.697,45.936 h1.52
  text "-" at 271.687,45.936 h1.52
  text "8" at 85.76,42.126 h1.52
  text "59.06mil (1.500mm)" at 100.742,42.126 h1.52
  text "PTH" at 129.69,42.126 h1.52
  text "Round" at 142.539,42.126 h1.52
  text "Top Layer - Bottom Layer" at 161.177,42.126 h1.52
  text "Pad" at 199.266,42.126 h1.52
  text "(Mixed)" at 214.248,42.126 h1.52
  text "(Mixed)" at 233.191,42.126 h1.52
  text "-" at 249.697,42.126 h1.52
  text "-" at 271.687,42.126 h1.52
  text "1" at 85.76,38.316 h1.52
  text "98.43mil (2.500mm)" at 100.742,38.316 h1.52
  text "NPTH" at 129.69,38.316 h1.52
  text "Round" at 142.539,38.316 h1.52
  text "Top Layer - Bottom Layer" at 161.177,38.316 h1.52
  text "Pad" at 199.266,38.316 h1.52
  text "Rounded" at 214.248,38.316 h1.52
  text "c0hn250p0" at 233.191,38.316 h1.52
  text "-" at 249.697,38.316 h1.52
  text "-" at 271.687,38.316 h1.52
  text "4" at 85.76,34.506 h1.52
  text "122.05mil (3.100mm)" at 100.742,34.506 h1.52
  text "NPTH" at 129.69,34.506 h1.52
  text "Round" at 142.539,34.506 h1.52
  text "Top Layer - Bottom Layer" at 161.177,34.506 h1.52
  text "Pad" at 199.266,34.506 h1.52
  text "Rounded" at 214.248,34.506 h1.52
  text "c550hn310" at 233.191,34.506 h1.52
  text "-" at 249.697,34.506 h1.52
  text "-" at 271.687,34.506 h1.52
  text "139 Total" at 85.76,30.696 h1.52

## Dimensions
0,57.836 to 0,0 on Dimensions
65.989,57.836 to 0,57.836 on Dimensions

## Text inside footprints (layer, text, board x,y; h text height)
J5: Top Overlay "1" at 2.393,10.362 h0.8 r90